# Altium PCB PCB_Layout.PcbDoc
Units mil, origin at the board's own origin, x right, y up, seen from the top; angles counter-clockwise.
Board outline 4630 x 4000 mil, 2 copper layers (Top Layer, Bottom Layer); 54 components, 62 nets, 236 pads, 6 vias.
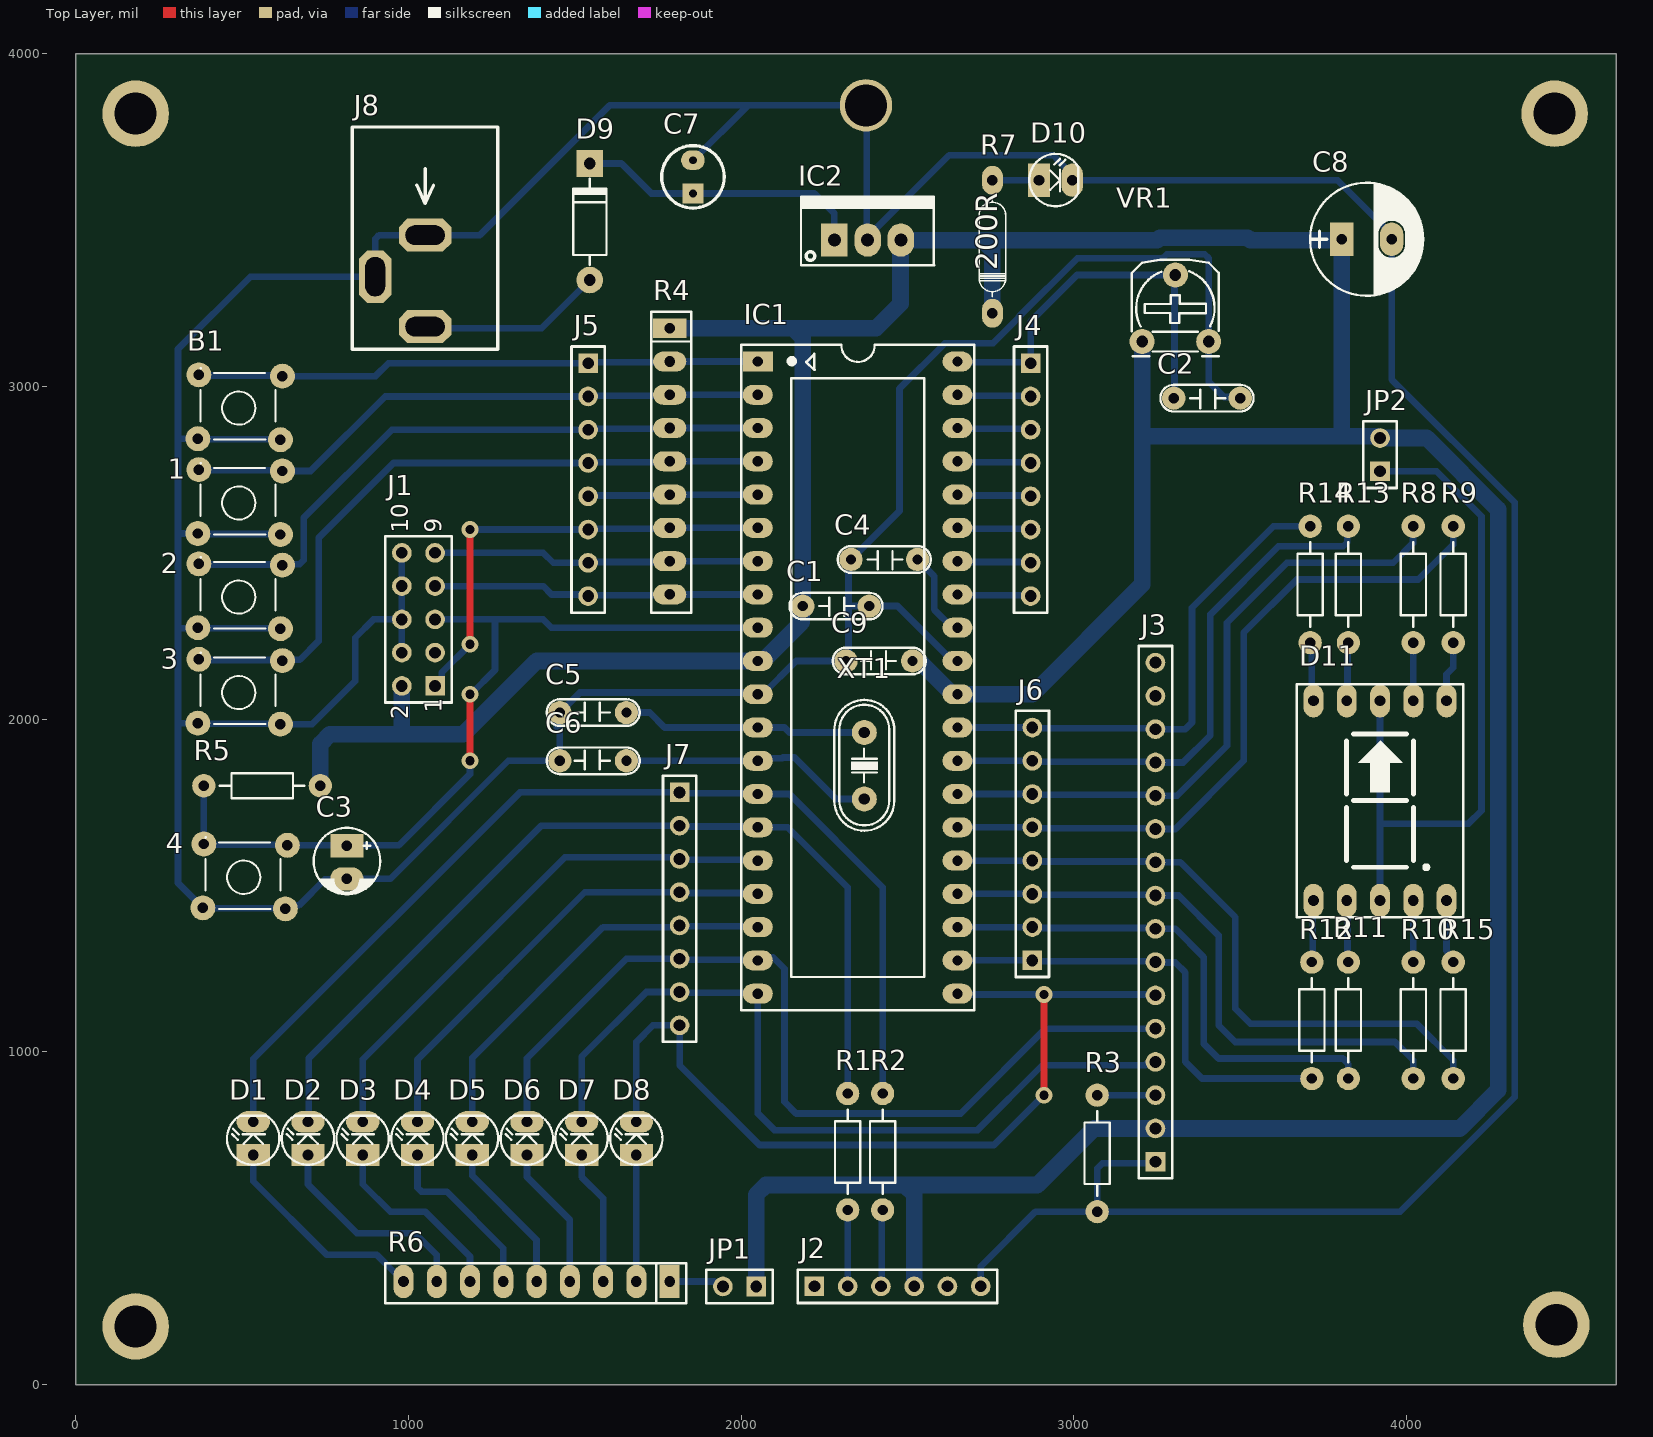
[diagram p0: Top Layer view]
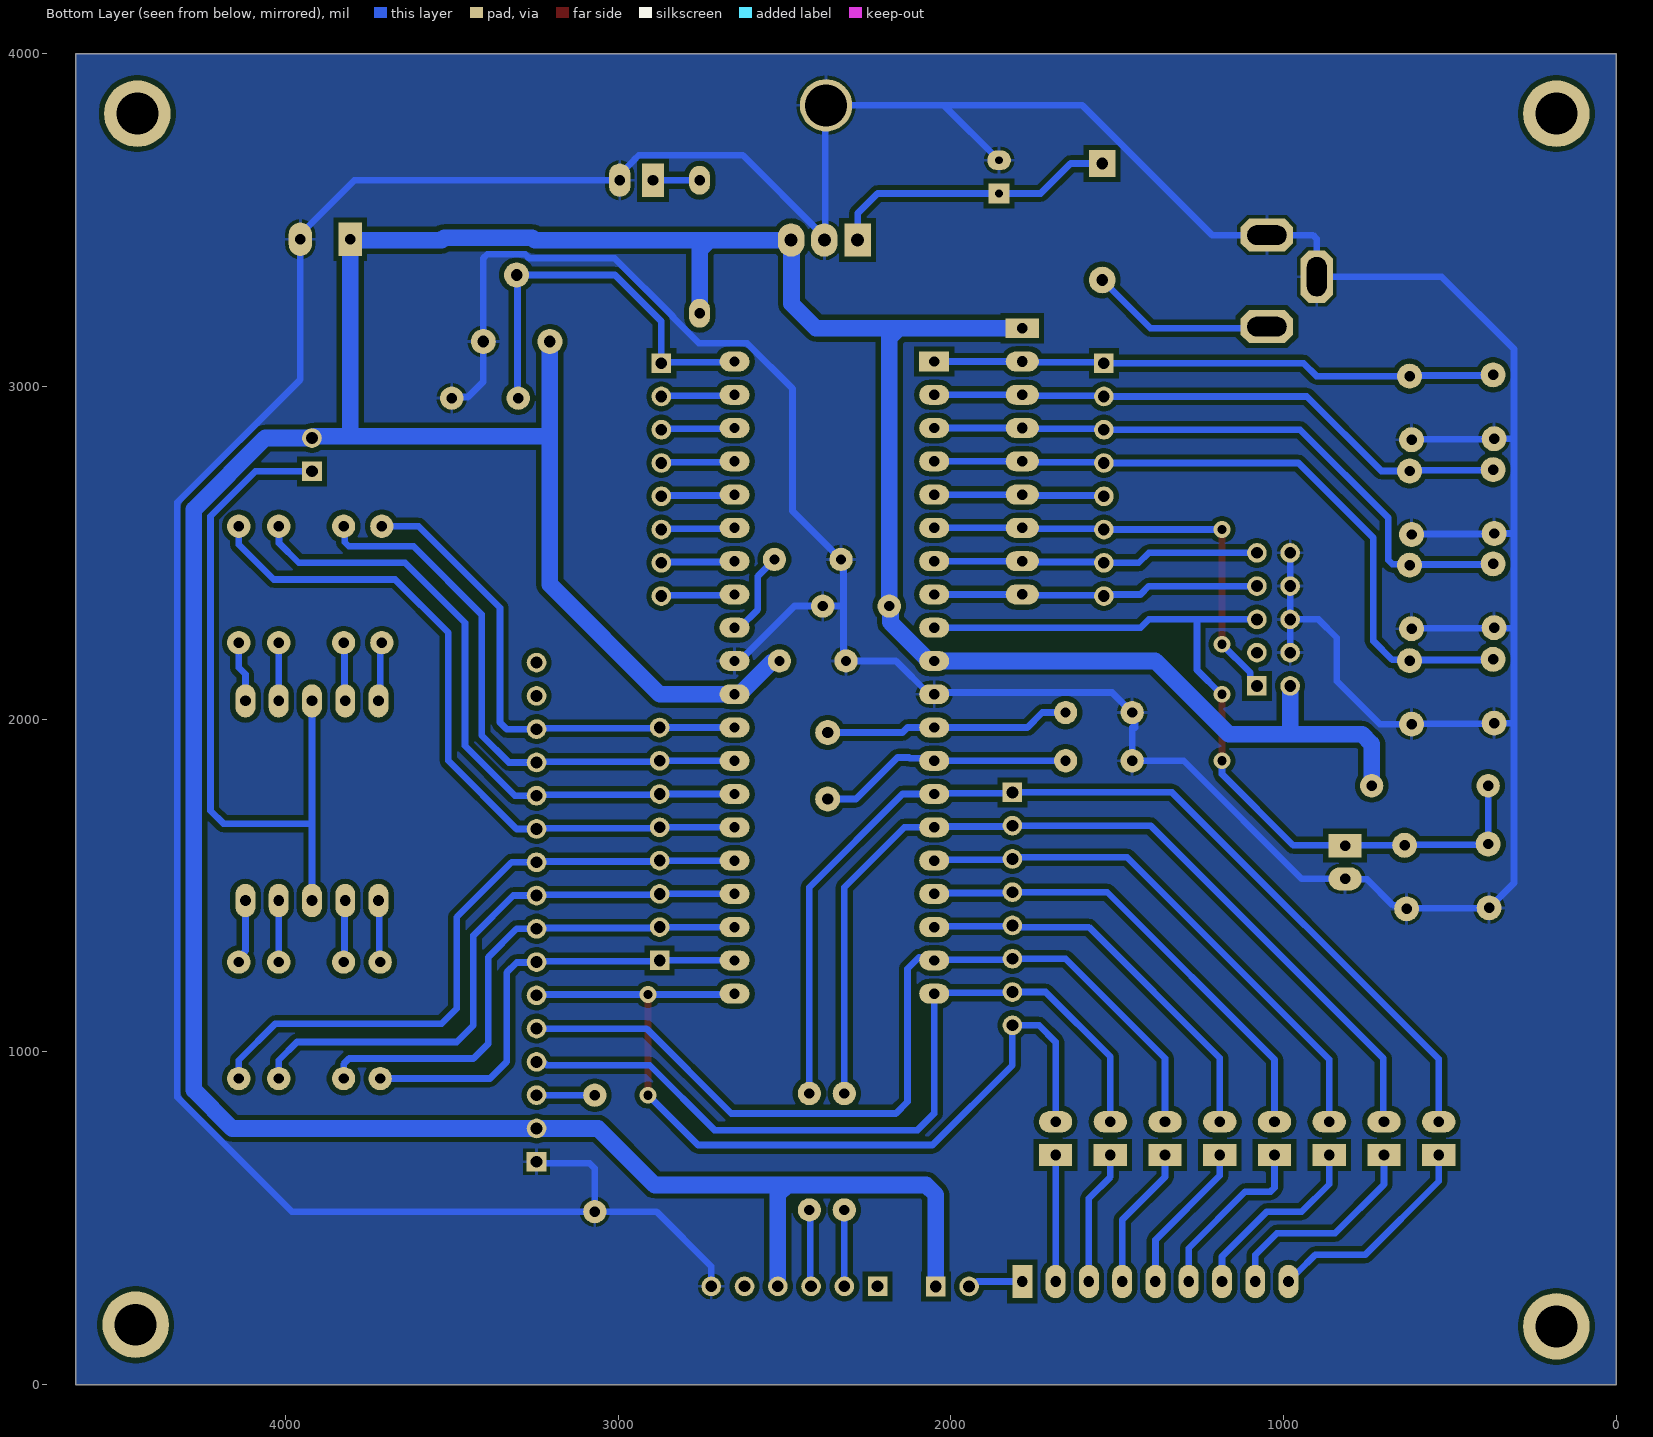
[diagram p1: Bottom Layer view, seen from below]
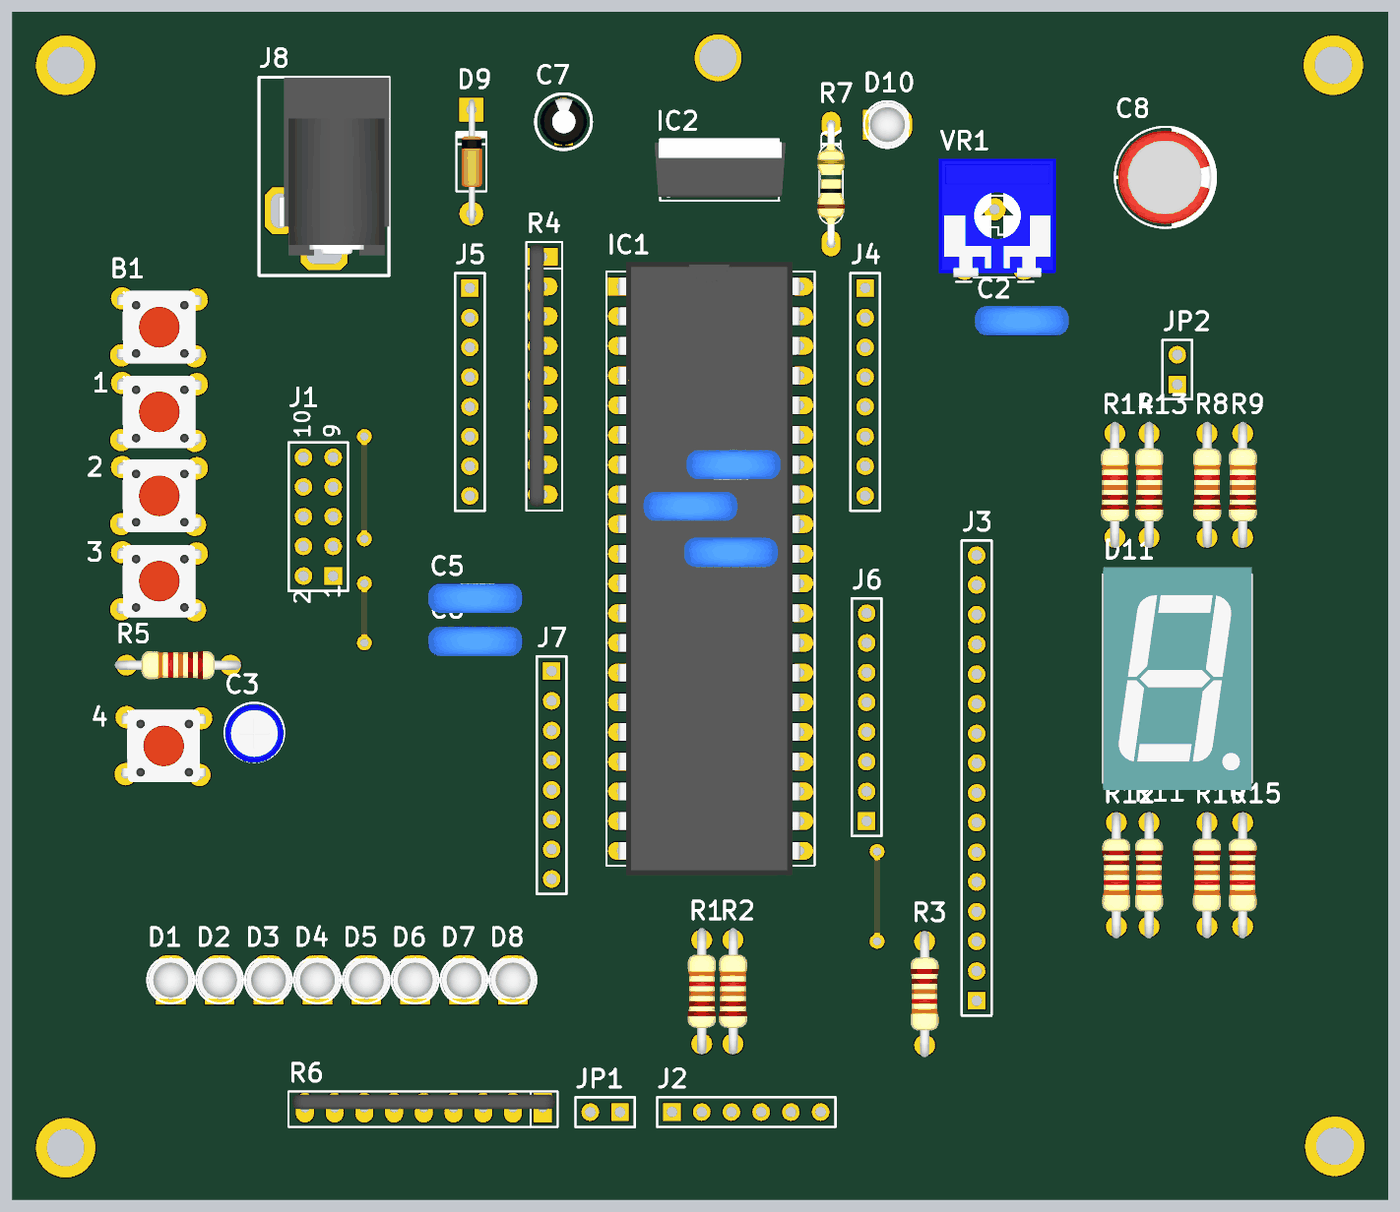
[diagram p2: 3D render of the assembled board from above, using the file's embedded part models]

## Layer stack, top to bottom
Top Solder: solder mask 0.4, Solder Resist, Dk 3.5
Top Layer: signal copper 1.4
Dielectric 1: dielectric 12.6, FR-4, Dk 4.8
Bottom Layer: signal copper 1.4
Bottom Solder: solder mask 0.4, Solder Resist, Dk 3.5

## Board outline
4630,4000 0,4000 0,0 4630,0

## Design rules (kind name [scope] priority, off if disabled: settings)
Clearance [All] p1: gap=15 ignorepadtopadclearanceinfootprint=FALSE
ComponentClearance [All] p1 off: gap=10 collisioncheckmode=3 verticalgap=10 showdistances=FALSE
HoleSize [All] p1: absolutevalues=TRUE maxlimit=200 minlimit=1 maxpercent=80.000 minpercent=20.000
MinimumSolderMaskSliver [All] p1 off: minsoldermaskwidth=10
PolygonConnect [All] p1: connectstyle=Relief reliefconductorwidth=10 reliefentries=4 polygonreliefangle="90 Angle" airgapwidth=10
RoutingVias [All] p1: holewidth=28 width=50 viastyle="Through Hole" minholewidth=28 minwidth=50 maxholewidth=28 maxwidth=50
SilkToSilkClearance [All] p1 off: silktosilkclearance=10
SilkToSolderMaskClearance [IsPad] p1 off: minsilkscreentomaskgap=10 clearancetoexposedcopper=TRUE
SolderMaskExpansion [All] p1: expansion=4 istentingtop=FALSE
Width Width_power [InNet('VCC')] p1: maxlimit=80 minlimit=40 preferedwidth=50 minimp=50.000000 maximp=50.000000 favimp=50.000000
Width [All] p2: maxlimit=30 minlimit=15 preferedwidth=20 minimp=50.000000 maximp=50.000000 favimp=50.000000
25 further rules are at their usual default settings.

## Components (designator, comment, footprint, x,y, rotation, side; value= is the part's Value field where it differs from the comment)
1 "B2" SW4 615,2555 r180 top value="Button chip 4 pin"
2 "B3" SW4 615,2272 r180 top value="Button chip 4 pin"
3 "B4" SW4 615,1985 r180 top value="Button chip 4 pin"
4 "RESET" SW4 630,1430 r180 top value="Button chip 4 pin"
B1 "" SW4 615,2840 r180 top value="Button chip 4 pin"
C1 "100nF" CN2 2385,2340 r180 top value=0.1uF
C2 "100nF" CN2 3500,2965 r180 top value=0.1uF
C3 "10uF" CP1/2 815,1620 r270 top value=10uF/50V
C4 "100nF" CN2 2530,2480 r180 top value=0.1uF
C5 "22pF" CN2 1455,2020 r0 top
C6 "22pF" CN2 1455,1875 r0 top
C7 "1000uF" C3MM 1855,3630 r90 top
C8 "1000uF/16V" CP1.5/3.4 3805,3442.5 r0 top
C9 "100nF" CN2 2315,2175 r0 top
D1 "LED" LED-3 533.58,690 r90 top value="LED 3 ly Single Colour"
D2 "LED" LED-3 698.07,690 r90 top value="LED 3 ly Single Colour"
D3 "LED" LED-3 862.56,690 r90 top value="LED 3 ly Single Colour"
D4 "LED" LED-3 1027.05,690 r90 top value="LED 3 ly Single Colour"
D5 "LED" LED-3 1191.54,690 r90 top value="LED 3 ly Single Colour"
D6 "LED" LED-3 1356.02,690 r90 top value="LED 3 ly Single Colour"
D7 "LED" LED-3 1520.51,690 r90 top value="LED 3 ly Single Colour"
D8 "LED" LED-3 1685,690 r90 top value="LED 3 ly Single Colour"
D9 "1N4007" D1A 1545,3320 r270 top
D10 "LED 5mm" LED-3 2895,3620 r0 top value="LED 3 ly Single Colour"
D11 "7SEG S" 7SEGS 3720,1455 r0 top value="LED 7S SEG"
IC1 "ATmega 16" DIP40/W0.6 2050,3075 r270 top value="Atmega 16L"
IC2 "LM7805" QTO-220 2280,3440 r0 top
J1 "" HDR2X5 1080,2100 r90 top
J2 "UART-USB" HDR1X6 2220,295.44 r0 top
J3 "LCD1602" HDR1X16 3245,670 r90 top
J4 "PA" HDR1X8 2870,3070 r270 top
J5 "PB" HDR1X8 1540,3070 r270 top
J6 "PC" HDR1X8 2875,1275 r90 top
J7 "PD" HDR1X8 1815,1780 r270 top
J8 "DC 9-12V" PW-J-2MM 1050,3180 r180 top
JP1 "" HDR1X2 2045,295 r180 top
JP2 "" HDR1X2 3920,2745 r90 top
R1 "" R1/4W 2320,875 r270 top value="R1/4W - 100"
R2 "" R1/4W 2425,875 r270 top value="R1/4W - 100"
R3 "1k" R1/4W 3070,520 r90 top value="R1/4W - 1K"
R4 "10K" RN8 1785,3175 r270 top value="Tro thanh 10K"
R5 "10k" R1/4W 385,1800 r0 top value="R1/4W - 10K"
R6 "1K" RN8 1785,310 r180 top value="Tro thanh 1K"
R7 "R0.4W" "DIEN TRO 1/4 W" 2755,3220 r90 top value=R
R8 "1k" R1/4W 4020,2580 r270 top value="R1/4W - 1K"
R9 "1k" R1/4W 4140,2580 r270 top value="R1/4W - 1K"
R10 "1k" R1/4W 4020,920 r90 top value="R1/4W - 1K"
R11 "1k" R1/4W 3825,920 r90 top value="R1/4W - 1K"
R12 "1k" R1/4W 3715,920 r90 top value="R1/4W - 1K"
R13 "1k" R1/4W 3825,2580 r270 top value="R1/4W - 1K"
R14 "1k" R1/4W 3710,2580 r270 top value="R1/4W - 1K"
R15 "1k" R1/4W 4140,920 r90 top value="R1/4W - 1K"
VR1 "10K" VR 3205,3135 r0 top value="VR 10K"
XT1 "8MHz" XT2 2370,1860 r270 top

## Footprints (in the part's own frame and the unit in brackets; to place one, negate y for a bottom-side part, rotate by r counter-clockwise, add the part's x,y. Pads: shape width x height; smd on the part's side, far side on the other; paste and mask are expansions set on the pad)
7SEGS [mil] "DIP 10 Leads; Body 12 x 15 mm; Pitch 0.5 mm"
  oval 60x100 hole 32: 1(0,0) 2(100,0) 3(200,0) 4(300,0) 5(400,0) 6(400,600) 7(300,600) 8(200,600) 9(100,600) 10(0,600)
  silkscreen extent -50,-50 450,650, body extent -50,-75 450,675, height 316
C3MM [mm]
  rect 1.5x1.58 hole 0.6: 1(-1.27,0)
  oval 1.5x1.8 hole 0.6: 2(1.27,0)
  silkscreen extent -2.39,-2.39 2.39,2.39, body extent -2,-2.03 1.99,1.97, height 7.01
CN2 [mil]
  round 70 hole 31: 1(0,0) 2(200,0)
  silkscreen extent -40,-40 240,40, body extent -54,-44 260,55, height 407
CP1.5/3.4 [mil] "Tu hoa 220->470uF,16V, 470uF/16V,25V"
  rect 70x100 hole 32: 1(0,0)
  oval 70x100 hole 32: 2(150,0)
  silkscreen extent -95,-170 245,170, body extent -85,-157 230,157, height 446
CP1/2 [mil] "Tu hoa < 22uF/16>50V"
  rect 70x100 hole 32: 1(0,0)
  oval 70x100 hole 32: 2(100,0)
  silkscreen extent -53,-100 146,100, body extent -49,-99 149,99, height 287
D1A [mil] "Diode 1A, W 100mil, L 350mil"
  round 80 hole 35: 1(0,0)
  rect 80x80 hole 35: 2(-350,0)
  silkscreen extent -305,-50 -45,50, body extent -386,-33 34,36, height 84
"DIEN TRO 1/4 W" [mm]
  oval 2.2x1.6 hole 0.787: 1(0,0) 2(10.16,0)
  silkscreen extent 1.26,-1.02 8.88,1.02, body extent -0.3,-1.16 10.46,1.16, height 2.93
DIP40/W0.6 [mil] "40 PIN, W 600mil, Pin to pin 100mil"
  rect 60x90 hole 31: 1(0,0)
  oval 60x90 hole 31: 2(100,0) 3(200,0) 4(300,0) 5(400,0) 6(500,0) 7(600,0) 8(700,0) 9(800,0) 10(900,0) 11(1000,0) 12(1100,0) 13(1200,0) 14(1300,0) 15(1400,0) 16(1500,0) 17(1600,0) 18(1700,0) 19(1800,0) 20(1900,0) 21(1900,600) 22(1800,600) 23(1700,600) 24(1600,600) 25(1500,600) 26(1400,600) 27(1300,600) 28(1200,600) 29(1100,600) 30(1000,600) 31(900,600) 32(800,600) 33(700,600) 34(600,600) 35(500,600) 36(400,600) 37(300,600) 38(200,600) 39(100,600) 40(0,600)
  silkscreen extent -50,-50 1950,650, body extent -82,-10 1982,600, height 224
HDR1X2 [mm] "Connector; Header; 2 Position"
  rect 1.5x1.5 hole 0.9: 1(0,0)
  round 1.5 hole 0.9: 2(2.54,0)
  silkscreen extent -1.27,-1.27 3.81,1.27, body extent -1.27,-1.27 3.81,1.27, height 7
HDR1X6 [mm] "Connector; Header; 6 Position"
  rect 1.5x1.5 hole 0.9: 1(0,0)
  round 1.5 hole 0.9: 2(2.54,0) 3(5.08,0) 4(7.62,0) 5(10.16,0) 6(12.7,0)
  silkscreen extent -1.27,-1.27 13.97,1.27, body extent -1.27,-1.27 13.97,1.27, height 7
HDR1X8 [mm] "Connector; Header; 8 Position"
  rect 1.5x1.5 hole 0.9: 1(0,0)
  round 1.5 hole 0.9: 2(2.54,0) 3(5.08,0) 4(7.62,0) 5(10.16,0) 6(12.7,0) 7(15.24,0) 8(17.78,0)
  silkscreen extent -1.27,-1.27 19.05,1.27, body extent -1.27,-1.27 19.05,1.27, height 7
HDR1X16 [mm] "Connector; Header; 16 Position"
  rect 1.5x1.5 hole 0.9: 1(0,0)
  round 1.5 hole 0.9: 2(2.54,0) 3(5.08,0) 4(7.62,0) 5(10.16,0) 6(12.7,0) 7(15.24,0) 8(17.78,0) 9(20.32,0) 10(22.86,0) 11(25.4,0) 12(27.94,0) 13(30.48,0) 14(33.02,0) 15(35.56,0) 16(38.1,0)
  silkscreen extent -1.27,-1.27 39.37,1.27, body extent -1.27,-1.27 39.37,1.27, height 7
HDR2X5 [mm] "Connector; Header; 5x2 Position"
  rect 1.5x1.5 hole 0.9: 1(0,0)
  round 1.5 hole 0.9: 2(0,2.54) 3(2.54,0) 4(2.54,2.54) 5(5.08,0) 6(5.08,2.54) 7(7.62,0) 8(7.62,2.54) 9(10.16,0) 10(10.16,2.54)
  silkscreen extent -1.27,-1.27 11.43,3.81, body extent -1.27,-1.27 11.43,3.81, height 7
LED-3 [mil] "LED 2 PIN, 3ly Only colour"
  rect 65x100 hole 32: 1(0,0)
  oval 65x100 hole 32: 2(100,0)
  silkscreen extent -29,-78 118,79, body extent -13,-75 125,75, height 217
PW-J-2MM [mm] "Power Header 2mm"
  oct 4x2.5 hole 1.5 slot 3 at 0 deg paste-2539.97: 1(0,0) 3(0,-6.985)
  oct 2.5x4 hole 1.5 slot 3 at 90 deg paste-2539.97: 2(3.81,-3.81)
  silkscreen extent -5.54,-15.24 5.56,1.73, body extent -5.56,-15.2 3.84,0, height 11
QTO-220 [mil] "TO-220 - 1-2-3"
  rect 80x100 hole 39: 1(0,0)
  oval 80x100 hole 39: 2(100,0) 3(200,0)
  silkscreen extent -100,-76 300,130, body extent -119,-64 322,121, height 755
R1/4W [mil] "R 1/4W, 2 Pin, 350mil"
  round 70 hole 31: 1(0,0) 2(350,0)
  silkscreen extent 48,-38 302,38, body extent -40,-47 386,47, height 111
RN8 [mil] "R SIP8, 9 Pin"
  rect 60x100 hole 32: 1(0,0)
  oval 60x100 hole 32: 2(100,0) 3(200,0) 4(300,0) 5(400,0) 6(500,0) 7(600,0) 8(700,0) 9(800,0)
  silkscreen extent -50,-55 855,65, body extent -43,-44 843,5, height 259
SW4 [mil] "SW button 4pin, 250 x250 mil"
  round 75 hole 31: 1(0,0) 2(245,-195) 3(248,-3) 4(-6,-191)
  silkscreen extent 15,-215 240,0, body extent -36,-220 276,24, height 276
VR [mil] "Resistor Variable"
  round 75 hole 35: 1(0,0) 2(100,200) 3(200,0)
  silkscreen extent -31,-44 231,246, body extent -87,-30 307,372, height 165
XT2 [mil] "Footpin for Crystal 2 pin"
  round 75 hole 34: 1(-100,0) 2(100,0)
  silkscreen extent -198,-90 195,90, body extent -233,-93 213,90, height 138

## Part data
1 2 3 4 B1: library part SW4, "Switch button 4 pin"
C1 C2 C4 C5 C6 C9: library part CN2, "Cap np 104 => 105pF"
C3: library part CP1, "Cap P  0,1uF < 22uF , 16 - 50V", Description 1="10 => 220uF/6,3V/10V - 10uF => 100uF/16V", Description 2="0,1uF => 33uF/50V - 10uF => 22uF/63V", Description 3="0,47uF => 10uF/100V"
C7: library part "Cap Pol 3mm", "Polarized Capacitor (Axial)", LatestRevisionDate=17-Jul-2002, LatestRevisionNote="Re-released for DXP Platform.", PackageReference=POLAR0.8, Published=8-Jun-2000, Publisher="Altium Limited"
C8: library part CP4, "Cap 1000uF/16V - 220uF/50V", Description 1="2200uF-3300uF/6,3V - 1000uF-2200uF/10V", Description 2="1000uF/16V - 470uF => 1000uF/25V - 100uF/100V", Description 3=330uF>470uF/35V_220uF>470uF/50V_10uF>22uF/250V, Description 4="220uF => 330uF/63V - 10uF =>33uF/160 - 200V", Description 5="4,7uF>10uF/250V_3,3uF>10uF/400V - 2,2uF>4,7uF/450V"
D1 D2 D3 D4 D5 D6 D7 D8: "LED Single colour Green and Red"
D9: library part D1A, "Diode 1A"
D10: library part LED, "LED Single colour Green and Red"
D11: library part LED7S_1, "Single 7 Seg Dipslay"
IC1: library part ATmega16A-PU, "8-Bit AVR Microcontroller with 16K Bytes of In-System Programmable Flash Memory"
IC2: library part LM78xx, "On ap +, from + 5 to + 24VDC"
J1: library part "Header 5X2", "Header, 5-Pin, Dual row", LatestRevisionDate=17-Jul-2002, LatestRevisionNote="Re-released for DXP Platform.", Publisher="Altium Limited"
J2: library part "Header 6", "Header, 6-Pin", LatestRevisionDate=17-Jul-2002, LatestRevisionNote="Re-released for DXP Platform.", Publisher="Altium Limited"
J3: library part "Header 16", "Header, 16-Pin", LatestRevisionDate=17-Jul-2002, LatestRevisionNote="Re-released for DXP Platform.", Publisher="Altium Limited"
J4 J5 J6 J7: library part "Header 8", "Header, 8-Pin", LatestRevisionDate=17-Jul-2002, LatestRevisionNote="Re-released for DXP Platform.", Publisher="Altium Limited"
J8: library part PWR2.5, "Low Voltage Power Supply Connector", ComponentLink1Description="Manufacturer Link", ComponentLink1URL=http://domino.kycon.com/internet/Products.html, DatasheetDocument=09-May-2002, Published=17-Dec-2003, Publisher="Altium Limited"
JP1 JP2: library part "Header 2", "Header, 2-Pin", LatestRevisionDate=17-Jul-2002, LatestRevisionNote="Re-released for DXP Platform.", Publisher="Altium Limited"
R1 R2: library part R1/4W, "Resistor 1/4W"
R3 R5 R8 R9 R10 R11 R12 R13 R14 R15: library part R, "Resistor 1/4W"
R4 R6: library part RN8, "Resistor 8 (Thanh)"
R7: library part "Res 1/4 W", "Resistor", LatestRevisionDate=17-Jul-2002, LatestRevisionNote="Re-released for DXP Platform.", PackageReference=AXIAL-0.4, Published=8-Jun-2000, Publisher="Altium Limited"
VR1: library part VR1, "Var Resistor"
XT1: library part Crystal, "Crystal Oscillator", LatestRevisionDate=17-Jul-2002, LatestRevisionNote="Re-released for DXP Platform.", PackageReference=R38, Published=8-Jun-2000, Publisher="Altium Limited"

## Free pads (board coordinates)
  round 200 hole 125.98 unplated: ""(180,175) ""(180,3820) ""(4445,3820) ""(4450,180)
  round 157.48 hole 125.98 unplated: ""(2375,3845)

## Via types
v1: diameter 50, hole 28, Top Layer to Bottom Layer, 6 vias

## Nets (pads, with @x,y where several pads share a name; then routed paths per layer and width w, separated by ;. In a path a pad name is that pad's centre, name@x,y a point inside that pad or via, vN(x,y) a via of type N, cw(c..) or ccw(c..) an arc to the next point about the centre after c; other vN are vias at no path point)
AVR_RX: D1.2 IC1.14 J7.1 R2.1 | length 3150
  Bottom Layer w20: D1.2 533.58,978.58 1335,1780 J7.1 1817.5,1777.5 2047.5,1777.5 IC1.14 2145,1775 2425,1495 R2.1
AVR_TX: D2.2 IC1.15 J7.2 R1.1 | length 2797.4
  Bottom Layer w20: D2.2 700,791.93 700,980 1400,1680 J7.2 1817.5,1677.5 2047.5,1677.5 IC1.15 2140,1675 2320,1495 R1.1
FT_RX: J2.2 R1.2 | length 229.6
  Bottom Layer w20: J2.2 R1.2
FT_TX: J2.3 R2.2 | length 231.6
  Bottom Layer w20: J2.3 2422.5,297.94 2422.5,522.5 R2.2
MISO: IC1.7 J1.9 J5.7 R4.8 | length 984.5
  Bottom Layer w20: J1.9 1405,2500 1435,2470 J5.7 1542.5,2472.5 1782.5,2472.5 R4.8 IC1.7
MOSI: IC1.6 J1.1 J5.6 R4.7 | length 1380.6
  Top Layer w20: v1(1185,2225) v1(1185,2570)
  Bottom Layer w20: J1.1 1099.53,2119.53 1099.53,2139.53 v1(1185,2225) ; v1(1185,2570) J5.6 1542.5,2572.5 1782.5,2572.5 R4.7 IC1.6
Net1_1: 1.1 1.3 2.1 2.3 3.1 3.3 4.1 4.3 B1.1 B1.3 C1.1 C2.1 C3.2 C4.2 C5.1 C6.1 C7.2 C8.2 C9.1 D10.2 IC1.11 IC1.31 IC2.2 J1.4 J1.6 J1.8 J1.10 J2.6 J3.1 J8.2 J8.3 pad.@2375,3845 R3.1 VR1.3 | length 18838.2
  Bottom Layer w20: 2.1 613.5,2273.5 368.5,2273.5 2.3 365.27,2273.27 313.27,2273.27 307.5,2267.5 ; 1.1 613.5,2556.5 368.5,2556.5 1.3 307.5,2558 ; B1.1 613.5,2841.5 368.5,2841.5 B1.3 307.5,2843 ; C3.2 814.04,1519.04 749.04,1519.04 670.52,1440.52 640.52,1440.52 4.1 628.5,1431.5 383.5,1431.5 4.3 307.5,1507.5 307.5,1988 ; C3.2@820.43,1520 945,1520 1300,1875 C6.1 1455,1975.08 ; J1.4 J1.6 ; J1.10 J1.8 J1.6 ; 1445.43,1975.08 1445.43,2010.43 C5.1 ; C5.1@1455,2010.43 C5.1 ; C7.2 2020,3845 ; IC1.31 2635,2175 2470,2340 C1.1 2322.5,2340 ; J2.6 2720,355 2885,520 R3.1 ; J3.1 3240,665 3085,665 3070,650 R3.1 ; C2.1 3496.54,2968.46 3451.54,2968.46 3405,3015 VR1.3 3405,3385.78 3393.28,3397.5 3279.11,3397.5 3266.61,3385 3010,3385 2835,3210 2835,3208.29 2756.71,3130 2612.22,3130 2475.89,2993.67 2475.89,2625.89 C4.2 2322.5,2472.5 2322.5,2340 ; 307.5,1988 307.5,2047.5 307.5,2215.5 307.5,2267.5 ; 307.5,1988 3.3 368.5,1986.5 613.5,1986.5 3.1 710,1985 840,2115 840,2245 895,2300 J1.6 ; 307.5,2267.5 307.5,2558 ; 307.5,2558 307.5,2843 ; 307.5,2843 307.5,3112.5 525,3330 J8.2 900,3443.28 911.72,3455 J8.3 1214.64,3455 1604.64,3845 2020,3845 ; C5.1 1515,2080 2045,2080 IC1.11 2065,2075 2165,2175 C9.1 2322.5,2182.5 2322.5,2340 ; 2020,3845 2375,3845 2377.5,3842.5 2377.5,3442.5 IC2.2 2390,3450 2390,3460 2625,3695 2937.86,3695 2952.5,3680.36 2952.5,3680 2995,3637.5 D10.2 3792.5,3620 3955,3457.5 C8.2 3955,3021.42 4325,2651.42 4325,864.29 3980.71,520 R3.1
NetC4_1: C4.1 IC1.32 | length 263.5
  Bottom Layer w20: C4.1 2580,2430 2580,2330 2635,2275 IC1.32
NetC5_2: C5.2 IC1.12 XT1.1 | length 739.9
  Bottom Layer w20: C5.2 1725,2020 1770,1975 IC1.12 2130,1975 2145,1960 XT1.1
NetC6_2: C6.2 IC1.13 XT1.2 | length 770.9
  Bottom Layer w20: C6.2 IC1.13 2057.65,1882.65 2123.48,1882.65 2125.82,1885 2160,1885 2285,1760 XT1.2
NetC7_1: C7.1 D9.2 IC2.1 | length 877.1
  Bottom Layer w20: D9.2 1640,3670 1730,3580 C7.1 2220,3580 2280,3520 IC2.1
NetD1_1: D1.1 R6.9 | length 660.2
  Bottom Layer w20: D1.1 533.58,611.42 755,390 905,390 957.35,337.65 966.52,337.65 985,319.18 R6.9
NetD2_1: D2.1 R6.8 | length 642.8
  Bottom Layer w20: D2.1 698.07,601.93 845,455 1020,455 1085,390 R6.8
NetD3_1: D3.1 R6.7 | length 575.1
  Bottom Layer w20: D3.1 862.56,602.44 945,520 1050,520 1185,385 R6.7
NetD4_1: D4.1 R6.6 | length 601.4
  Bottom Layer w20: D4.1@1038.28,690 D4.1@1060.78,667.5 ; D4.1@1055.78,667.5 1033.28,690 D4.1 1027.05,591.72 1038.76,580 1115,580 1285,410 R6.6
NetD5_1: D5.1 R6.5 | length 460.1
  Bottom Layer w20: D5.1 1191.54,628.46 1385,435 R6.5
NetD6_1: D6.1 R6.4 | length 433.4
  Bottom Layer w20: D6.1 1356.02,623.98 1485,495 R6.4
NetD7_1: D7.1 R6.3 | length 406.7
  Bottom Layer w20: D7.1 1520.51,624.49 1585,560 R6.3
NetD8_1: D8.1 R6.2 | length 380
  Bottom Layer w20: R6.2 D8.1
NetD9_1: D9.1 J8.1 | length 557.1
  Bottom Layer w20: J8.1 1055,3175 1400,3175 D9.1
NetD10_1: D10.1 R7.2 | length 157.5
  Bottom Layer w20: R7.2 D10.1 D10.1@2895,3637.5
NetD11_1: D11.1 R12.2 | length 187.1
  Bottom Layer w20: R12.2 3717.5,1272.5 3717.5,1452.5 D11.1
NetD11_2: D11.2 R11.2 | length 187.1
  Bottom Layer w20: D11.2 3822.5,1452.5 3822.5,1272.5 R11.2
NetD11_3: D11.3 D11.8 JP2.1 | length 2167.1
  Bottom Layer w20: D11.3 3920,1686 ; D11.8 3920,1686 ; JP2.1 4090,2745 4225,2610 4225,1725 4186,1686 3920,1686
NetD11_4: D11.4 R10.2 | length 188.5
  Bottom Layer w20: D11.4 R10.2 R10.2@4022.5,1272.5
NetD11_5: D11.5 R15.2 | length 203.9
  Bottom Layer w20: D11.5 4120,1303.53 4140,1283.53 R15.2 R15.2@4132.5,1277.5
NetD11_6: D11.6 R9.2 | length 183.3
  Bottom Layer w20: D11.6 4120,2135 4140,2155 R9.2
NetD11_7: D11.7 R8.2 | length 175
  Bottom Layer w20: D11.7 R8.2
NetD11_9: D11.9 R13.2 | length 177.1
  Bottom Layer w20: D11.9 3822.5,2057.5 3822.5,2227.5 R13.2
NetD11_10: D11.10 R14.2 | length 179.1
  Bottom Layer w20: R14.2 3715,2225 3715,2060 D11.10
NetJ3_3: J3.3 R3.2 | length 175
  Bottom Layer w20: R3.2 J3.3
NetJP1_2: JP1.2 R6.1 | length 166.2
  Bottom Layer w20: R6.1 1919.43,310 1934.43,295 JP1.2
PA0: C2.2 IC1.40 J4.1 VR1.2 | length 1212.4
  Bottom Layer w20: IC1.40 2652.5,3072.5 2867.5,3072.5 J4.1 2870,3195.5 3009.5,3335 VR1.2 3302.5,3332.5 3302.5,2967.5 C2.2
PA1: IC1.39 J4.2 | length 222.1
  Bottom Layer w20: IC1.39 2652.5,2972.5 2867.5,2972.5 J4.2
PA2: IC1.38 J4.3 | length 222.1
  Bottom Layer w20: IC1.38 2652.5,2872.5 2867.5,2872.5 J4.3
PA3: IC1.37 J4.4 | length 222.1
  Bottom Layer w20: IC1.37 2652.5,2772.5 2867.5,2772.5 J4.4
PA4: IC1.36 J4.5 | length 222.1
  Bottom Layer w20: IC1.36 2652.5,2672.5 2867.5,2672.5 J4.5
PA5: IC1.35 J4.6 | length 222.1
  Bottom Layer w20: IC1.35 2652.5,2572.5 2867.5,2572.5 J4.6
PA6: IC1.34 J4.7 | length 222.1
  Bottom Layer w20: IC1.34 2652.5,2472.5 2867.5,2472.5 J4.7
PA7: IC1.33 J4.8 | length 222.1
  Bottom Layer w20: IC1.33 2652.5,2372.5 2867.5,2372.5 J4.8
PB0: B1.2 B1.4 IC1.1 J5.1 R4.2 | length 1699.9
  Bottom Layer w20: B1.2 372,3033 619,3033 B1.4 901,3031 940,3070 J5.1 1542.5,3072.5 1782.5,3072.5 R4.2 IC1.1
PB1: 1.2 1.4 IC1.2 J5.2 R4.3 | length 1776.5
  Bottom Layer w20: 1.2 372,2748 619,2748 1.4 706,2746 930,2970 J5.2 1542.5,2972.5 1782.5,2972.5 R4.3 IC1.2
PB2: 2.2 2.4 IC1.3 J5.3 R4.4 | length 1926.8
  Bottom Layer w20: 2.2 372,2465 619,2465 2.4 624.18,2466.18 673.28,2466.18 685,2477.89 685,2605 950,2870 J5.3 1542.5,2872.5 1782.5,2872.5 R4.4 IC1.3
PB3: 3.2 3.4 IC1.4 J5.4 R4.5 | length 2111.4
  Bottom Layer w20: 3.2 372,2178 619,2178 3.4 623.73,2178.73 673.73,2178.73 730,2235 730,2545 955,2770 J5.4 1542.5,2772.5 1782.5,2772.5 R4.5 IC1.4
PB4: IC1.5 J5.5 R4.6 | length 512.1
  Bottom Layer w20: J5.5 1542.5,2672.5 1782.5,2672.5 R4.6 IC1.5
PC0: IC1.22 J3.7 J6.1 R12.1 | length 1382.7
  Bottom Layer w20: IC1.22 J6.1 2877.5,1272.5 3242.5,1272.5 J3.7 3246.24,1268.76 3304.53,1268.76 3335,1238.28 3335,970 3385,920 R12.1 R12.1@3705.43,929.57
PC1: IC1.23 J3.8 J6.2 R11.1 | length 1541.1
  Bottom Layer w20: IC1.23 J6.2 2877.5,1372.5 3242.5,1372.5 J3.8 3305,1370 3390,1285 3390,1025 3435,980 3808.28,980 3825,963.28 R11.1
PC2: IC1.24 J3.9 J6.3 R10.1 | length 1790.3
  Bottom Layer w20: IC1.24 J6.3 2877.5,1472.5 3242.5,1472.5 J3.9 3315,1470 3435,1350 3435,1080 3485,1030 3965,1030 4020,975 R10.1
PC3: IC1.25 J3.10 J6.4 R15.1 | length 1954.6
  Bottom Layer w20: IC1.25 J6.4 2877.5,1572.5 3242.5,1572.5 J3.10 3320,1570 3485,1405 3485,1130 3530,1085 4030,1085 4140,975 R15.1
PC4: IC1.26 J3.11 J6.5 R9.1 | length 2126.8
  Bottom Layer w20: IC1.26 J6.5 2877.5,1672.5 3242.5,1672.5 J3.11 3305,1670 3510,1875 3510,2260 3670,2420 4035,2420 4140,2525 R9.1
PC5: IC1.27 J3.12 J6.6 R8.1 | length 1953.6
  Bottom Layer w20: IC1.27 J6.6 2877.5,1772.5 3242.5,1772.5 J3.12 3310,1770 3460,1920 3460,2290 3640,2470 3960,2470 4019.04,2529.04 4019.04,2579.04 R8.1
PC6: IC1.28 J3.13 J6.7 R13.1 | length 1710.1
  Bottom Layer w20: IC1.28 J6.7 2877.5,1872.5 3242.5,1872.5 J3.13 3328.28,1870 3410,1951.72 3410,2315 3615,2520 3809.64,2520 3821.36,2531.72 3821.36,2576.36 R13.1
PC7: IC1.29 J3.14 J6.8 R14.1 | length 1516.8
  Bottom Layer w20: IC1.29 J6.8 2877.5,1972.5 3242.5,1972.5 J3.14 3335,1970 3355,1990 3355,2335 3600,2580 R14.1
PD2: D3.2 IC1.16 J7.3 | length 1630.8
  Bottom Layer w20: D3.2 862.56,977.56 1470,1585 1810,1585 J7.3 1817.5,1577.5 2047.5,1577.5 IC1.16
PD3: D4.2 IC1.17 J7.4 | length 1420.4
  Bottom Layer w20: D4.2 1027.05,977.05 1530,1480 J7.4 1817.5,1477.5 2047.5,1477.5 IC1.17
PD4: D5.2 IC1.18 J7.5 | length 1217.1
  Bottom Layer w20: D5.2 1191.54,981.54 1585,1375 1810,1375 J7.5 1817.5,1377.5 2047.5,1377.5 IC1.18
PD5: D6.2 IC1.19 J3.5 J7.6 | length 2744.7
  Bottom Layer w20: D6.2 1356.02,981.02 1655,1280 J7.6 1817.5,1277.5 2047.5,1277.5 IC1.19 2057.65,1282.65 2092.65,1282.65 2095,1285 2130,1250 2130,850 2165,815 2660,815 2915,1070 J3.5
PD6: D7.2 IC1.20 J3.4 J7.7 | length 2468.3
  Bottom Layer w20: D7.2 1520.51,985.51 1715,1180 J7.7 1817.5,1177.5 2047.5,1177.5 IC1.20 2050,815 2100,765 2710,765 2905,960 3213.76,960 3216.28,962.53 3237.53,962.53 J3.4
PD7: D8.2 IC1.21 J3.6 J7.8 | length 2666.8
  Top Layer w20: v1(2910,870) v1(2910,1172.5)
  Bottom Layer w20: D8.2 1685,1030 1735,1080 J7.8 1815,960 2055,720 2760,720 v1(2910,870) ; IC1.21 2652.5,1172.5 v1(2910,1172.5) 3242.5,1172.5 J3.6
RESET: 4.2 4.4 C3.1 IC1.9 J1.5 R5.1 | length 2543
  Top Layer w20: v1(1185,1875) v1(1185,2075)
  Bottom Layer w20: R5.1 4.2 387,1623 634,1623 4.4 815,1621 971,1621 1185,1835 v1(1185,1875) ; J1.5 1260,2300 ; v1(1185,2075) 1187.22,2075 1260,2147.78 1260,2300 ; IC1.9 1430,2275 1405,2300 1260,2300
SCK: IC1.8 J1.7 J5.8 R4.9 | length 984.5
  Bottom Layer w20: J1.7 1405,2400 1430,2375 1535,2375 J5.8 1542.5,2372.5 1782.5,2372.5 R4.9 IC1.8
VCC: C1.2 C8.1 C9.2 IC1.10 IC1.30 IC2.3 J1.2 J2.4 J3.2 JP1.1 JP2.2 R4.1 R5.2 R7.1 VR1.1 | length 13292.5
  Bottom Layer w50: R5.2 735,1925.71 764.29,1955 980,1955 ; J1.2 980,1955 ; R4.1 2155.71,3175 ; JP1.1 2045,570.71 2074.29,600 2490.71,600 ; C9.2 2518.83,2171.17 2538.83,2171.17 2635,2075 IC1.30 2875,2075 3205,2405 3205,2850 ; J2.4 2520,570.71 2490.71,600 ; R7.1 2755,3410.71 2725.71,3440 ; VR1.1 3205,2850 ; C8.1@3802.5,3440 3530.45,3440 3522.95,3447.5 3258.4,3447.5 3250.9,3440 2725.71,3440 ; C8.1 3805,2850 ; 980,1955 1165,1955 1385,2175 IC1.10 2065,2175 2181.17,2291.17 2181.17,2336.17 C1.2 2185,3145.71 2155.71,3175 ; 2155.71,3175 2405,3175 2478.68,3248.68 2478.68,3438.68 IC2.3 2725.71,3440 ; 2490.71,600 2890,600 3060,770 J3.2 4160,770 4275,885 4275,2630.71 4060.71,2845 JP2.2 3917.55,2845 3912.55,2850 3805,2850 ; 3205,2850 3805,2850
pads on no net: J1.3 J2.1 J2.5 J3.15 J3.16

## Polygon pours and split planes (outlines as drawn)
Net1_1 on Bottom Layer "NET1_1_L02_P001" (solid, remove dead copper, pour order 1): 0,4000 4630,4000 4630,0 0,0
no net on Bottom Layer "NONET_L02_P000" (solid, remove dead copper, pour order 0): 0,4000 0,0 4630,0 4630,4000

## Text inside footprints (layer, text, board x,y; h text height)
J1: Top Overlay "10" at 1000,2560 h50 r90; Top Overlay "9" at 1100,2560 h50 r90; Top Overlay "1" at 1100,2020 h50 r90; Top Overlay "2" at 1000,2000 h50 r90
R7: Top Overlay "200R" at 2790,3350 h110.24 r90